# Altium PCB Brainy Modul.PcbDoc (part 2 of 2)
Units mm, origin at the board's own origin, x right, y up, seen from the top; angles counter-clockwise.
Board outline 62.64 x 89.24 mm, 2 copper layers (Top Layer, Bottom Layer), stack 1.569 mm thick; 42 components, 69 nets, 310 pads, 80 vias.
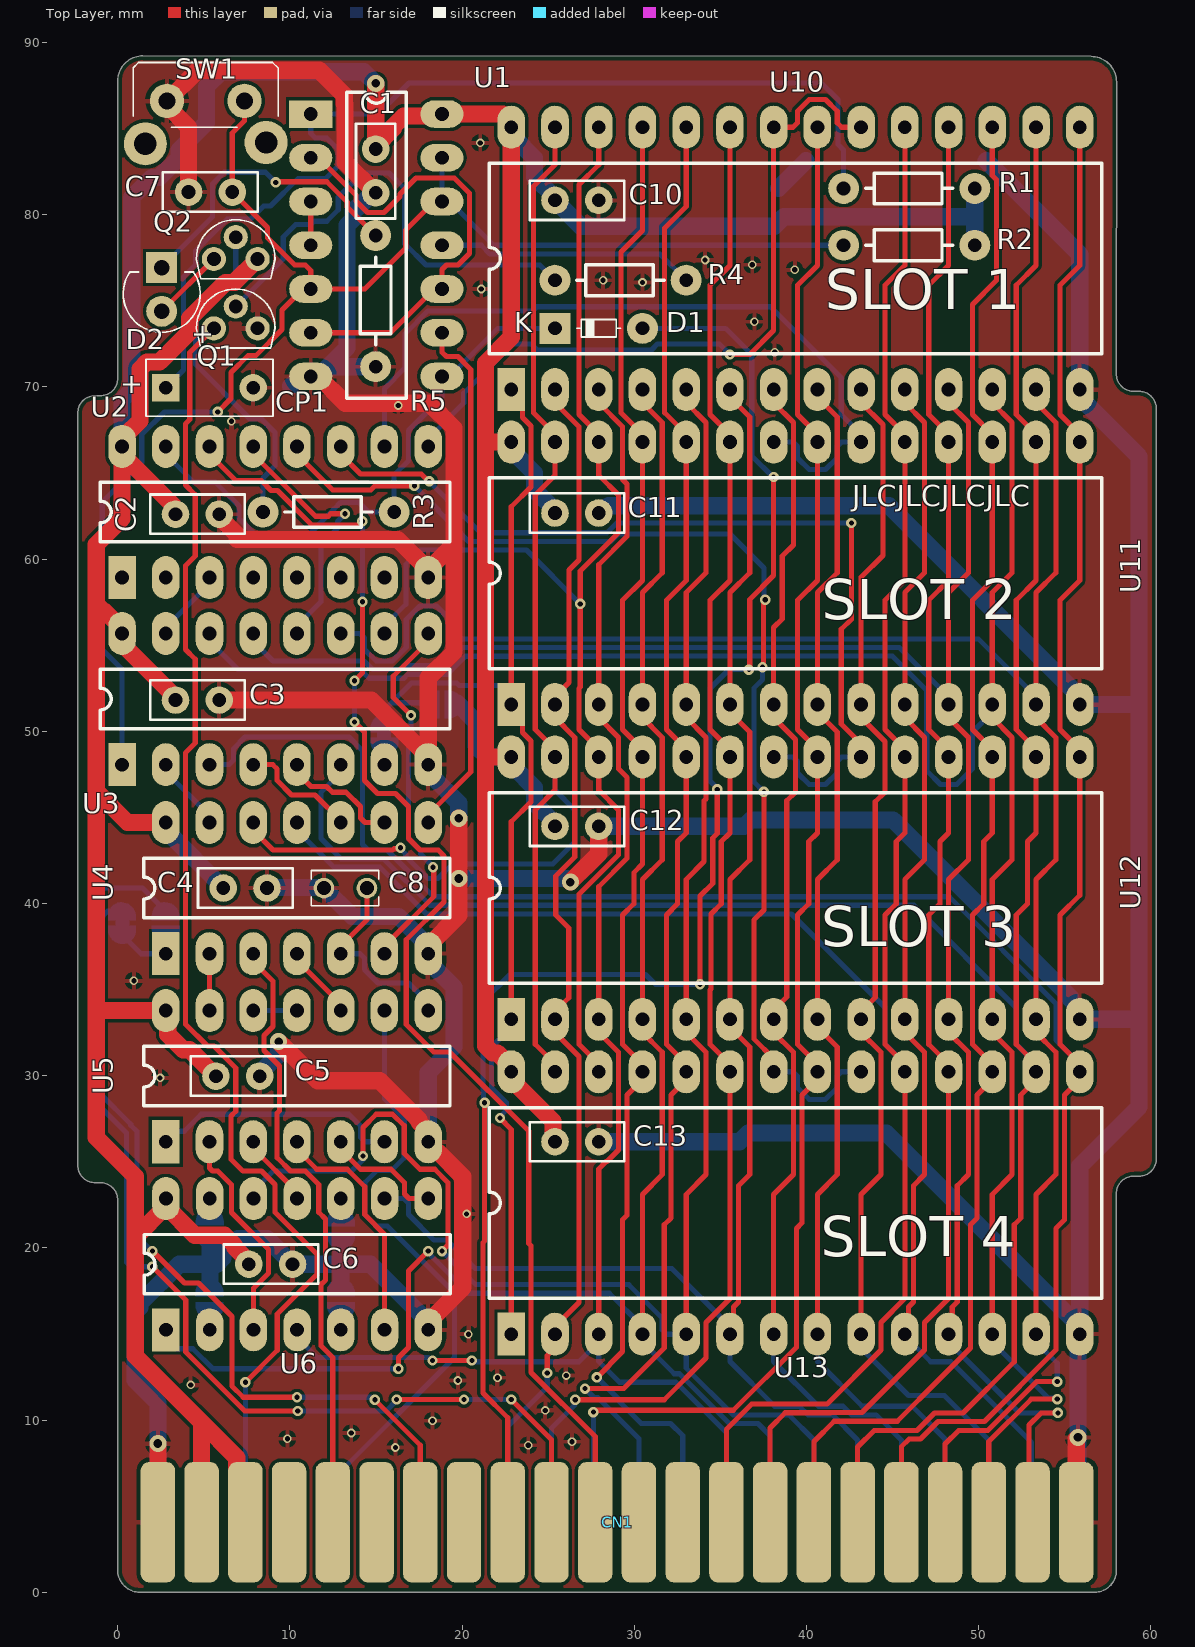
[diagram p0: Top Layer view]

## Via types
v1: diameter 0.6, hole 0.3, Top Layer to Bottom Layer, tented both sides, 47 vias
v2: diameter 0.5, hole 0.3, Top Layer to Bottom Layer, tented both sides, 26 vias
v3: diameter 1, hole 0.5, Top Layer to Bottom Layer, tented both sides, 7 vias

## Nets (pads, with @x,y where several pads share a name; then routed paths per layer and width w, separated by ;. In a path a pad name is that pad's centre, name@x,y a point inside that pad or via, vN(x,y) a via of type N, cw(c..) or ccw(c..) an arc to the next point about the centre after c; other vN are vias at no path point) (continued)
VCC: (continued)
  Top Layer w1: U4.14 0.574,44.704 -1.246,46.524 ; U6.14 U6.14@2.803,22.41 ; C3.2 3.36,51.972 0.254,55.078 0.254,55.972 -0.73,56.956 -0.814,56.956 -1.246,57.388 ; C2.2 3.245,62.726 3.245,63.107 U2.16@0.254,66.098 ; CN1.2 4.877,9.855 ; C5.2 4.178,31.503 3.803,31.503 2.909,32.397 2.909,33.667 U5.14 -1.158,33.782 -1.246,33.694 ; CN1.3 6.917,4.564 6.917,7.815 4.877,9.855 ; C6.2 7.62,19.212 6.789,20.044 6.789,20.144 6.203,20.73 4.483,20.73 U6.14@2.803,22.41 ; Q2.3 6.772,76.076 6.278,76.076 4.188,73.986 4.188,73.208 2.436,71.456 1.704,71.456 1.294,71.046 1.294,68.038 0.45,67.194 0.45,66.744 U2.16 U2.16@0.254,66.098 ; v3(14.986,87.63) C1.2 14.986,83.979 16.025,85.018 16.025,85.151 16.611,85.737 18.719,85.737 U1.14 22.386,85.852 22.86,85.378 U10.28 22.86,72.89 21.36,71.39 21.36,66.802 ; U12.28 21.36,48.514 ; U11.28 21.36,66.802 ; C13.2 25.285,26.277 25.285,27.351 23.056,29.58 23.056,30.03 U13.28 22.86,30.514 22.05,31.324 21.77,31.324 21.36,31.734 21.36,48.514 ; -1.246,33.694 -1.246,46.524 ; -1.246,33.694 -1.246,26.411 1.016,24.149 1.016,20.623 ; -1.246,46.524 -1.246,56.956 -1.246,57.388 ; -1.246,57.388 -1.246,60.854 0.254,62.354 U2.16@0.254,66.098 ; 1.016,20.623 U6.14@2.803,22.41 ; 1.016,20.623 1.016,13.716 4.877,9.855 ; 21.36,48.514 21.36,66.802
  Bottom Layer w1: U2.16 0.254,69.246 0.82,69.812 0.82,81.002 1.992,82.174 2.419,82.174 3.561,83.316 3.561,83.743 5.155,85.338 5.155,87.457 6.012,88.314 14.302,88.314 v3(14.986,87.63) ; U4.14 2.99,44.508 2.99,44.058 6.027,41.021 C4.2@6.134,41.021 ; J7.2 19.598,51.578 19.656,51.636 19.656,51.643 19.718,51.643 20.828,50.533 20.828,49.141 21.455,48.514 U12.28 23.056,48.318 23.056,47.868 24.204,46.72 24.204,45.841 25.4,44.644 C12.2 ; U11.28 23.056,66.606 23.056,66.156 24.204,65.008 24.204,64.039 25.4,62.843 C11.2 ; U10.28 23.056,84.894 23.056,84.444 24.204,83.296 24.204,82.2 25.4,81.004 C10.2 26.9,79.342 38.152,79.342 38.694,79.883 49.784,79.883 ; R2.1 49.784,79.883 ; R1.1 49.784,79.883
pads on no net: CN1.4 CN1.6 CN1.8 CN1.12 CN1.13 CN1.B CN1.D CN1.F CN1.H CN1.J SW1.3 SW1.4 U2.1 U2.2 U2.4 U2.5 U2.6 U2.7

## Polygon pours and split planes (outlines as drawn)
GND on Top Layer "Top Layer - GND" (solid, remove dead copper, pour order 0): 0,1.29 0,22.785 0.003,22.785 ccw(c-0.997,22.785) -0.997,23.785 -1.315,23.785 cw(c-1.315,24.785) -2.315,24.785 -2.315,68.494 cw(c-1.315,68.494) -1.315,69.494 -0.997,69.494 ccw(c-0.997,70.491) 0,70.491 0,87.766 cw(c1.47,87.766) 1.47,89.236 56.54,89.197 cw(c56.54,87.724) 58.014,87.724 58.008,70.748 ccw(c59.008,70.748) 59.008,69.748 59.327,69.748 cw(c59.327,68.748) 60.327,68.748 60.327,25.162 cw(c59.327,25.162) 59.327,24.162 59.008,24.162 ccw(c59.008,23.162) 58.008,23.162 58.008,1.29 cw(c56.718,1.29) 56.718,0 1.29,0 cw(c1.29,1.29)
GND on Bottom Layer "Bottom Layer - GND" (solid, remove dead copper, pour order 1): 0,1.29 0,22.785 0.003,22.785 ccw(c-0.997,22.785) -0.997,23.785 -1.315,23.785 cw(c-1.315,24.785) -2.315,24.785 -2.315,68.494 cw(c-1.315,68.494) -1.315,69.494 -0.997,69.494 ccw(c-0.997,70.491) 0,70.491 0,87.766 cw(c1.47,87.766) 1.47,89.236 56.54,89.197 cw(c56.54,87.724) 58.014,87.724 58.008,70.748 ccw(c59.008,70.748) 59.008,69.748 59.327,69.748 cw(c59.327,68.748) 60.327,68.748 60.327,25.162 cw(c59.327,25.162) 59.327,24.162 59.008,24.162 ccw(c59.008,23.162) 58.008,23.162 58.008,1.29 cw(c56.718,1.29) 56.718,0 1.29,0 cw(c1.29,1.29)

## Silkscreen, mask and mechanical layers (free items; w line width, h text height)
Top Overlay:
  text "JLCJLCJLCJLC" at 42.662,63.08 h1.2
Bottom Overlay:
  drawing of 70 lines, arcs and shapes, not listed
  text "Version: '.Version' / Revision: '.Revision' / Date: 03.07.2016" at 56.515,72.337 h2
  text "BRAINY" at 56.767,53.923 h8
Board:
  lines w0.1: 0,22.785 0,1.29 ccw(c1.29,1.29) 1.29,0 56.718,0 ccw(c56.718,1.29) 58.008,1.29 58.008,23.162 cw(c59.008,23.162) 59.008,24.162 59.327,24.162 ccw(c59.327,25.162) 60.327,25.162 60.327,68.748 ccw(c59.327,68.748) 59.327,69.748 59.008,69.748 cw(c59.008,70.748) 58.008,70.748 58.014,87.724 ccw(c56.54,87.724) 56.54,89.197 1.47,89.236 ccw(c1.47,87.766) 0,87.766 0,70.491 cw(c-0.997,70.491) -0.997,69.494 -1.315,69.494 ccw(c-1.315,68.494) -2.315,68.494 -2.315,24.785 ccw(c-1.315,24.785) -1.315,23.785 -0.997,23.785 cw(c-0.997,22.785) 0.003,22.785

## Text inside footprints (layer, text, board x,y; h text height)
CP1: Top Overlay "+" at 1.498,71.026 h2 r180; Top Assembly "+" at 1.498,71.026 h2 r180
D1: Top Overlay "K" at 23.045,72.766 h2; Top Assembly "K" at 23.045,72.766 h2
D2: Top Overlay "+" at 4.037,73.712 h2 r270; Top Assembly "+" at 4.037,73.712 h2 r270